# Altium PCB RSM_PCB.PcbDoc
Units mm, origin at the board's own origin, x right, y up, seen from the top; angles counter-clockwise.
Board outline 130 x 62 mm, 4 copper layers (Top Layer, GND, 3V3, Bottom Layer), stack 1.586 mm thick; 74 components, 41 nets, 215 pads, 0 vias.
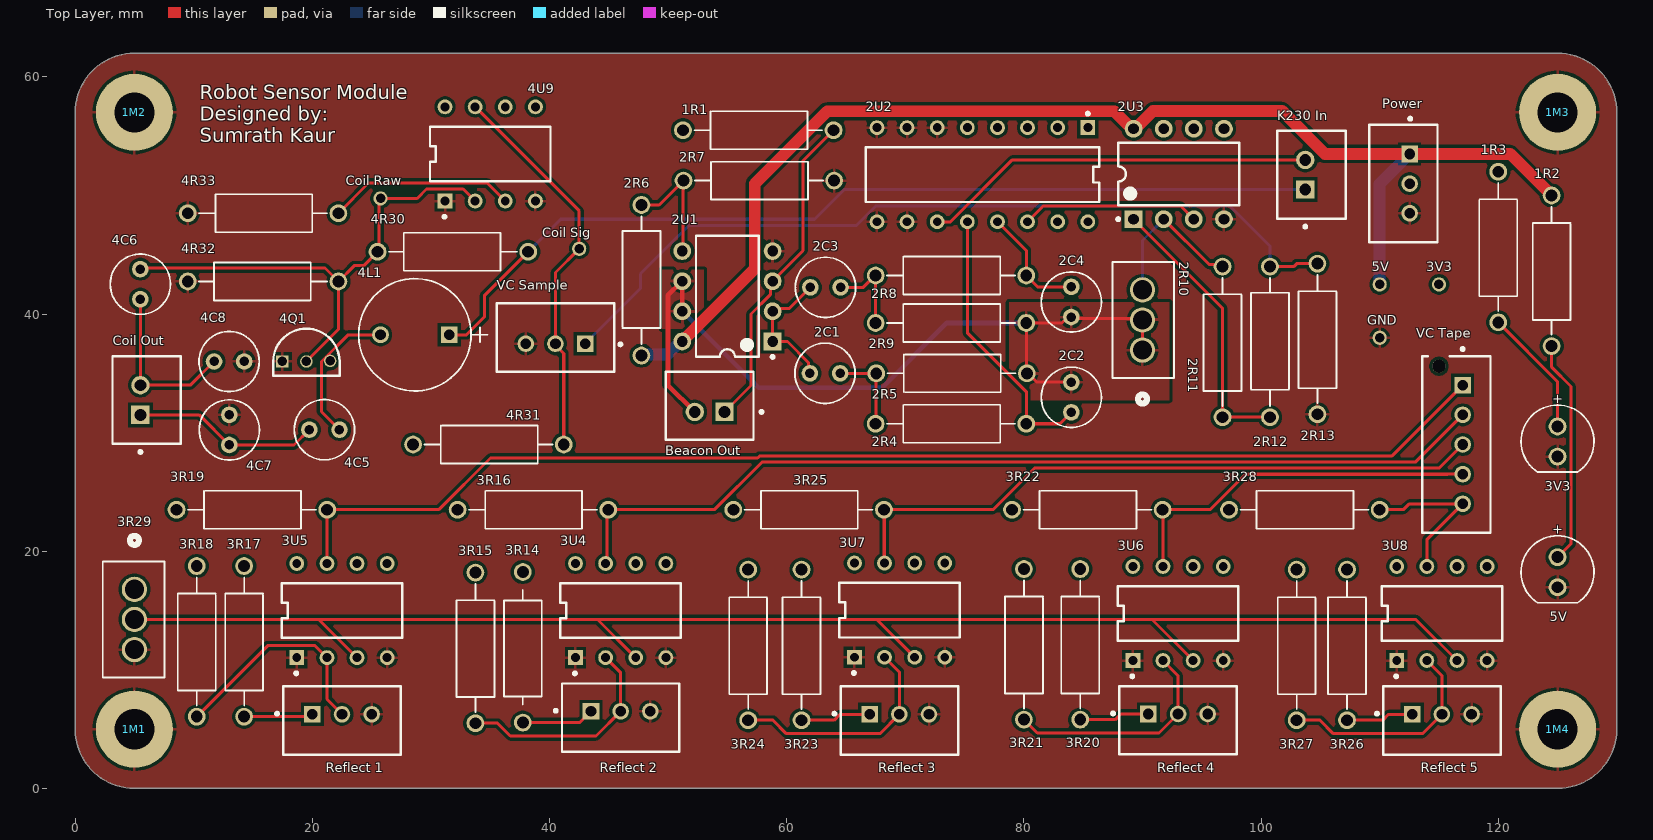
[diagram p0: Top Layer view]
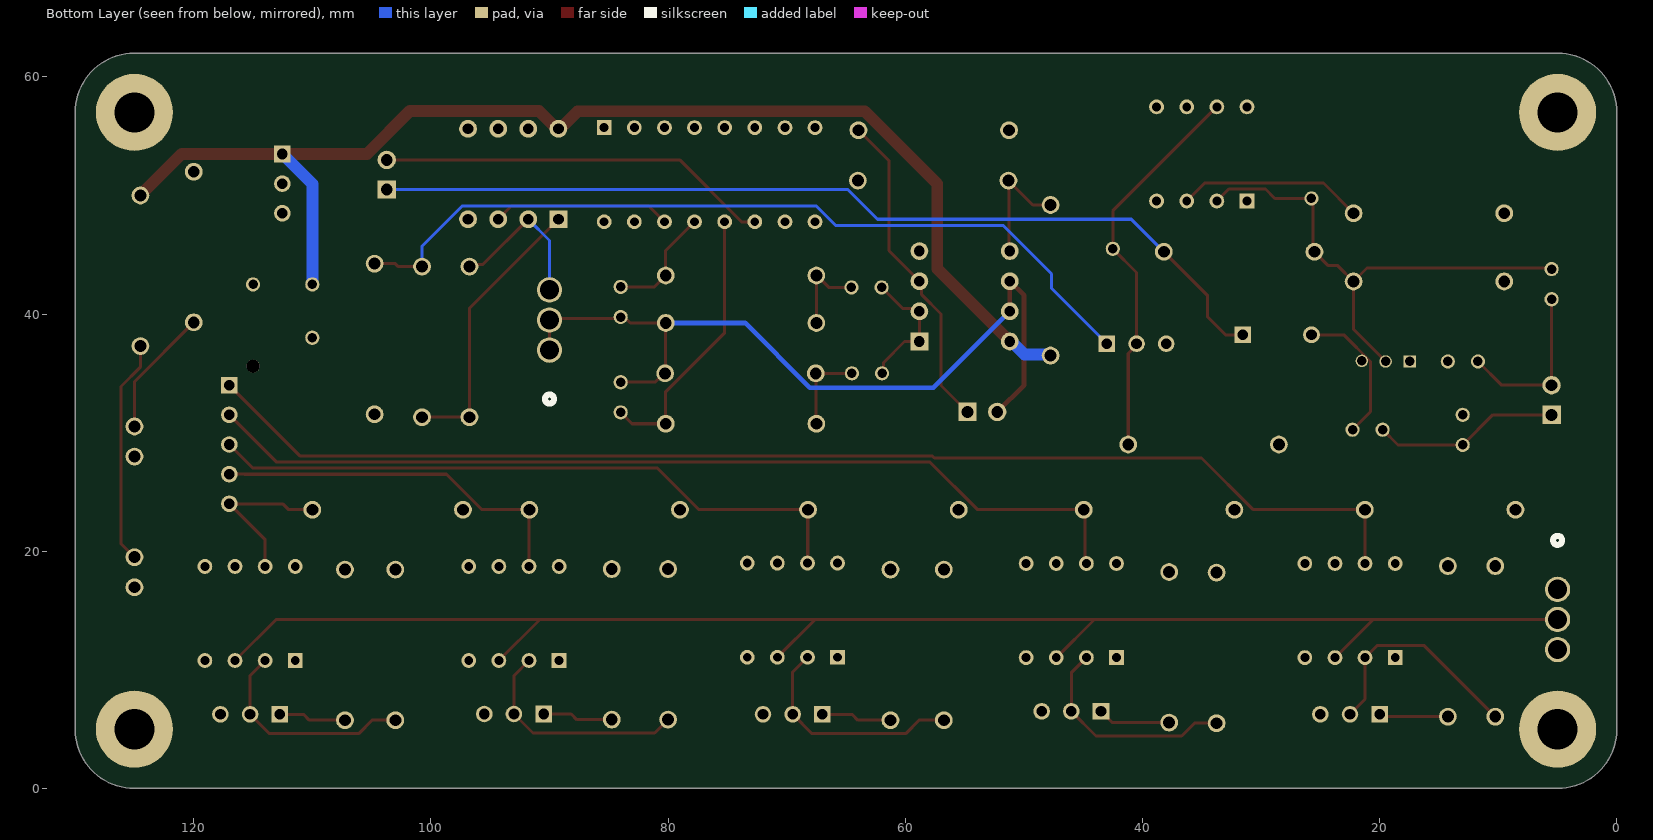
[diagram p1: Bottom Layer view, seen from below]
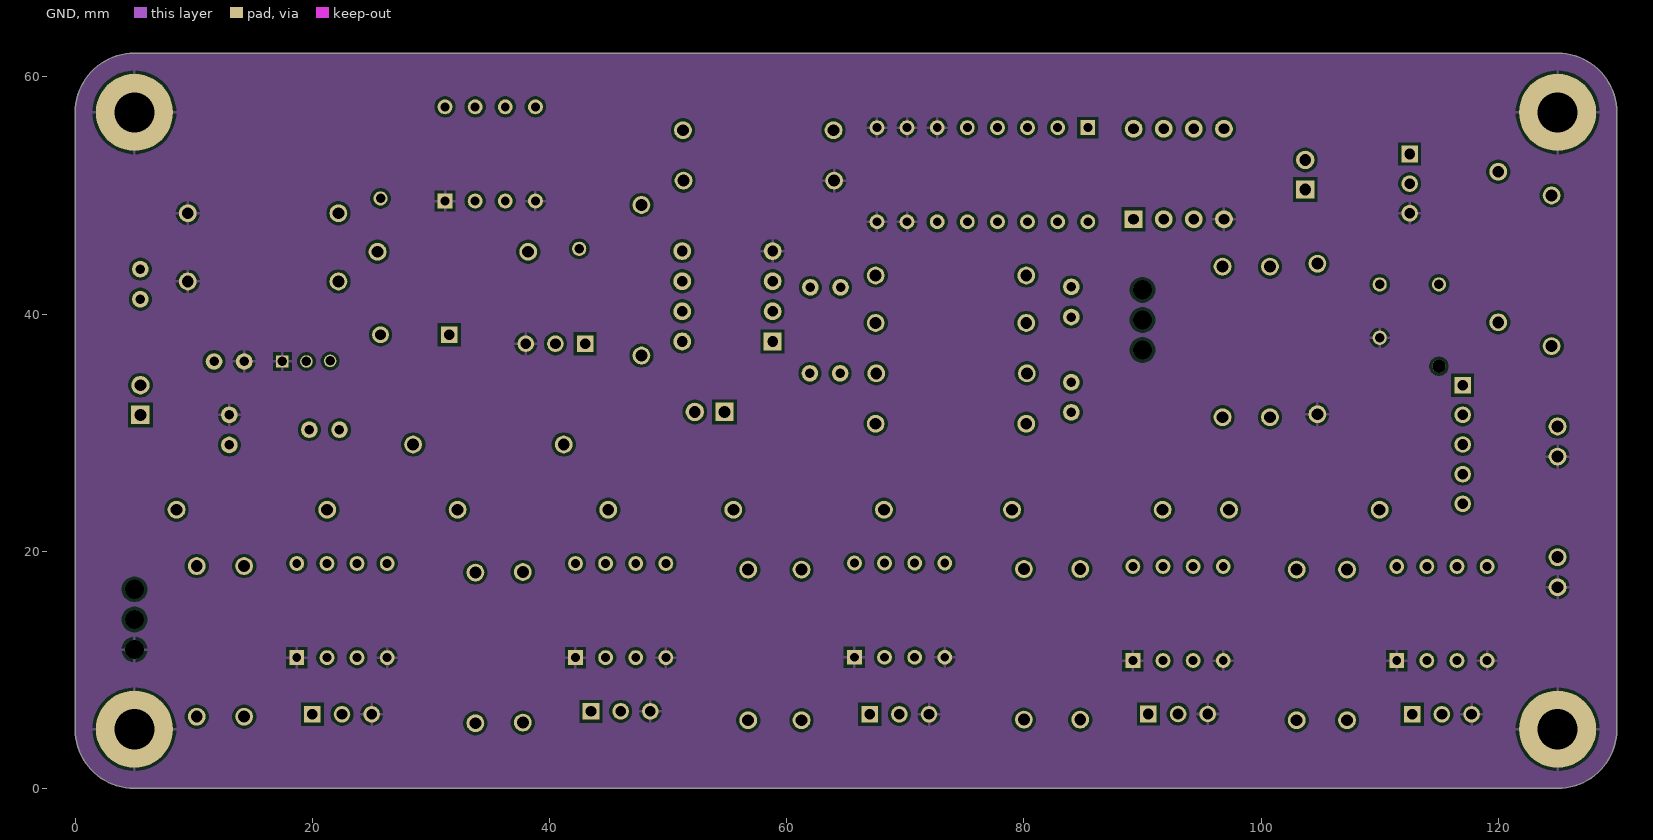
[diagram p2: GND]
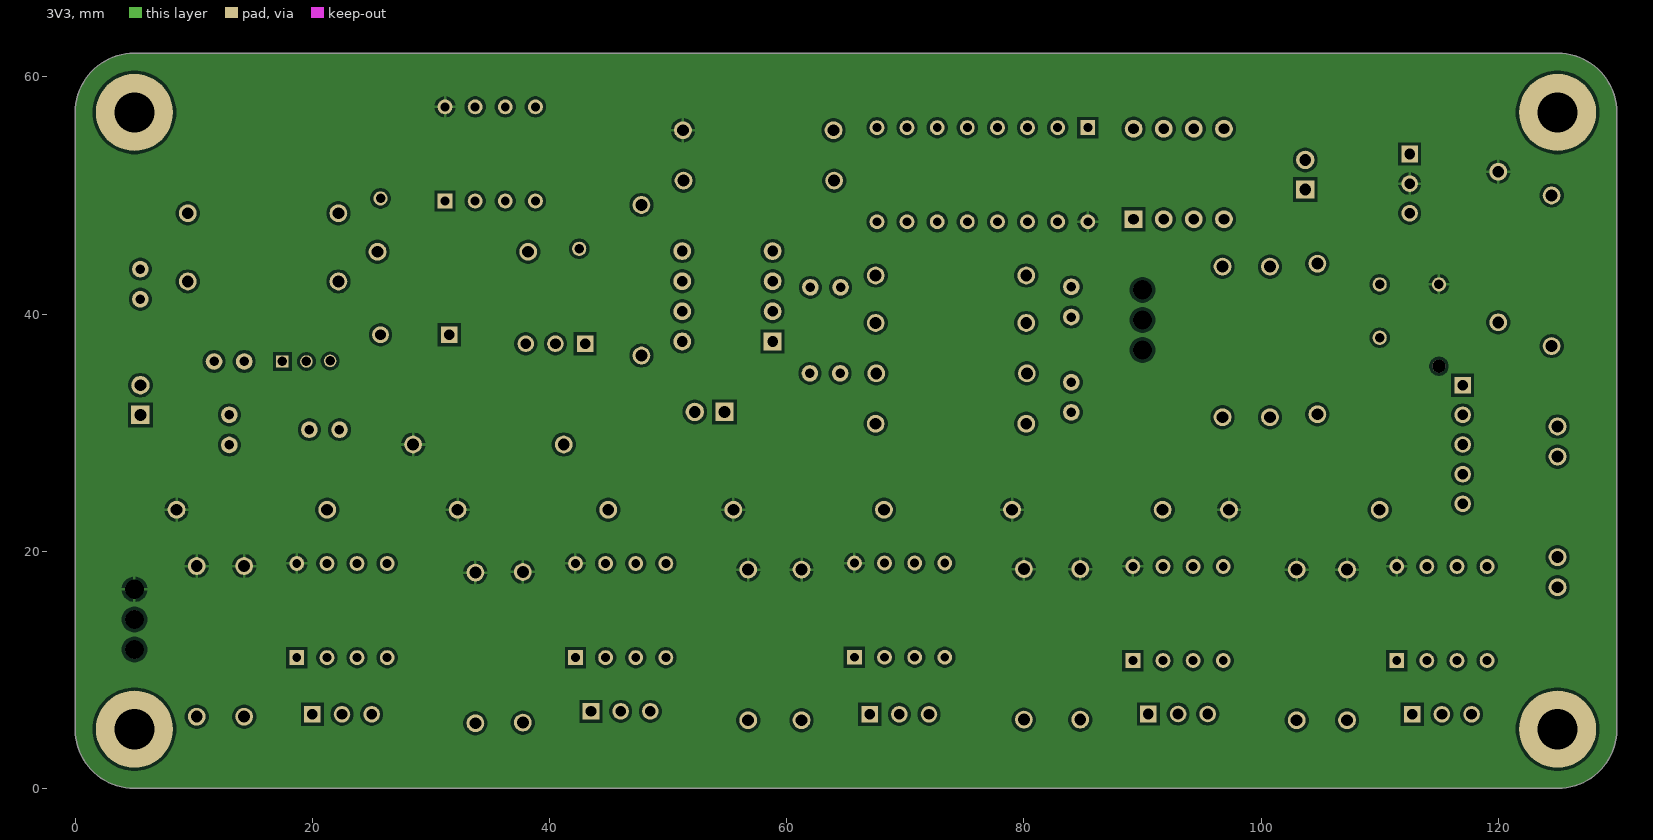
[diagram p3: 3V3]

## Layer stack, top to bottom
Top Solder: solder mask 0.0305, Solder Resist, Dk 3.8
Top Layer: signal copper 0.035
Dielectric 2: prepreg 0.2104, PP-006, Dk 4.4
GND: signal copper 0.0152
Dielectric 1: dielectric 1.065, FR-4, Dk 4.6
3V3: signal copper 0.0152
Dielectric 3: prepreg 0.2104, PP-006, Dk 4.4
Bottom Layer: signal copper 0.035
Bottom Solder: solder mask 0.0305, Solder Resist, Dk 3.8

## Board outline
0,5 0,57 cw(c5,57) 5,62 125,62 cw(c125,57) 130,57 130,5 cw(c125,5) 125,0 5,0 cw(c5,5)

## Design rules (kind name [scope] priority, off if disabled: settings)
Clearance [All] p1: gap=0.254 ignorepadtopadclearanceinfootprint=FALSE
PolygonConnect [All] p1: connectstyle=Relief reliefconductorwidth=0.254 reliefentries=4 polygonreliefangle="90 Angle" airgapwidth=0.254
RoutingVias [All] p1: holewidth=0.711 width=1.27 viastyle="Through Hole" minholewidth=0.711 minwidth=1.27 maxholewidth=0.711 maxwidth=1.27
SolderMaskExpansion [All] p1: expansion=0 istentingtop=FALSE
SupplyNets "Schematic Supply Nets_4" [InNet('QSD124_BOTTOM')] p1: voltage=0.000
SupplyNets "Schematic Supply Nets_3" [InNet('3V3')] p2: voltage=0.000
SupplyNets "Schematic Supply Nets_2" [InNet('5V')] p3: voltage=0.000
SupplyNets "Schematic Supply Nets_1" [InNet('GND')] p4: voltage=0.000
Width Width_Power [InNetClass('Power Nets')] p1: maxlimit=1 minlimit=0.4 preferedwidth=0.5
Width [All] p2: maxlimit=0.254 minlimit=0.254 preferedwidth=0.254
30 further rules are at their usual default settings.

## Classes and differential pairs
net class "Power Nets": 3V3 5V GND QSD124_BOTTOM
component class RSM: 1M1 1M2 1M3 1M4 1R1 1R2 1R3 3V3 5V J4 "K230 In" M1 M2 M3 M4 R1 "VC Sample"
component class Designator: 3R14 3R15 3R16 3R17 3R18 3R19 3R20 3R21 3R22 3R23 3R24 3R25 3R26 3R27 3R28 3R29 3U4 3U5 3U6 3U7 3U8
component class "Beacon Detector": 2C1 2C2 2C3 2C4 2R4 2R5 2R6 2R7 2R8 2R9 2R10 2R11 2R12 2R13 2U1 2U2 2U3 C1 C2 C3 C4 R4 R5 R6 R7 R8 R9 R10 R11 R12 R13 U1 U2 U3

## Components (designator, comment, footprint, x,y, rotation, side; value= is the part's Value field where it differs from the comment)
1M1 "M3 Mounting Hole Plated" "M3 Screw Hole - Plated" 5,5 r0 top (schematic designator M1)
1M2 "M3 Mounting Hole Plated" "M3 Screw Hole - Plated" 5,57 r0 top (schematic designator M2)
1M3 "M3 Mounting Hole Plated" "M3 Screw Hole - Plated" 125,57 r0 top (schematic designator M3)
1M4 "M3 Mounting Hole Plated" "M3 Screw Hole - Plated" 125,5 r0 top (schematic designator M4)
1R1 "? ohms" "Axial 0.5" 51.25,55.5 r0 top (schematic designator R1)
1R2 "150R" "Axial 0.5" 124.5,50 r270 top (schematic designator R2)
1R3 "100R" "Axial 0.5" 120,52 r270 top (schematic designator R3)
2C1 "100 nF" "Generic small capacitor" 61.96,35 r0 top (schematic designator C1)
2C2 "100 nF" "Generic small capacitor" 84,31.71 r90 top (schematic designator C2)
2C3 "10 nF" "Generic small capacitor" 62,42.25 r0 top (schematic designator C3)
2C4 "10 nF" "Generic small capacitor" 84,42.29 r270 top (schematic designator C4)
2R4 "1k" "Axial 0.5" 67.5,30.75 r0 top (schematic designator R4)
2R5 "3.3k" "Axial 0.5" 67.55,35 r0 top (schematic designator R5)
2R6 "100k" "Axial 0.5" 47.75,36.5 r90 top (schematic designator R6)
2R7 "100k" "Axial 0.5" 51.3,51.25 r0 top (schematic designator R7)
2R8 "1k" "Axial 0.5" 67.5,43.25 r0 top (schematic designator R8)
2R9 "3.3k" "Axial 0.5" 67.5,39.25 r0 top (schematic designator R9)
2R10 "10k pot" RES3_PV36W103C01B00_BRN 90,36.96 r90 top (schematic designator R10)
2R11 "1k" "Axial 0.5" 96.75,44 r270 top (schematic designator R11)
2R12 "100k" "Axial 0.5" 100.75,31.3 r90 top (schematic designator R12)
2R13 "100k" "Axial 0.5" 104.75,44.25 r270 top (schematic designator R13)
2U1 "TL082IP" P0008A 55,41.5 r180 top (schematic designator U1)
2U2 "CD4053BE" FP-N0016A-MFG 76.5,51.75 r270 top (schematic designator U2)
2U3 "TL082IP" P0008A 93.06,51.81 r90 top (schematic designator U3)
3R14 "100R" "Axial 0.5" 37.75,18.25 r270 top (schematic designator R14)
3R15 "4.7k" "Axial 0.5" 33.75,18.2 r270 top (schematic designator R15)
3R16 "10k" "Axial 0.5" 32.25,23.5 r0 top (schematic designator R16)
3R17 "100R" "Axial 0.5" 14.25,18.75 r270 top (schematic designator R17)
3R18 "4.7k" "Axial 0.5" 10.25,18.75 r270 top (schematic designator R18)
3R19 "10k" "Axial 0.5" 8.55,23.5 r0 top (schematic designator R19)
3R20 "100R" "Axial 0.5" 84.75,18.5 r270 top (schematic designator R20)
3R21 "4.7k" "Axial 0.5" 80,18.5 r270 top (schematic designator R21)
3R22 "10k" "Axial 0.5" 79,23.5 r0 top (schematic designator R22)
3R23 "100R" "Axial 0.5" 61.25,18.45 r270 top (schematic designator R23)
3R24 "4.7k" "Axial 0.5" 56.75,18.45 r270 top (schematic designator R24)
3R25 "10k" "Axial 0.5" 55.5,23.5 r0 top (schematic designator R25)
3R26 "100R" "Axial 0.5" 107.25,18.45 r270 top (schematic designator R26)
3R27 "4.7k" "Axial 0.5" 103,18.45 r270 top (schematic designator R27)
3R28 "10k" "Axial 0.5" 97.3,23.5 r0 top (schematic designator R28)
3R29 "100k pot" RES3_PV36W103C01B00_BRN 5,16.79 r270 top (schematic designator R29)
3U4 "LM311P" FP-P0008A-MFG 46,15 r90 top (schematic designator U4)
3U5 "LM311P" FP-P0008A-MFG 22.5,15 r90 top (schematic designator U5)
3U6 "LM311P" FP-P0008A-MFG 93,14.75 r90 top (schematic designator U6)
3U7 "LM311P" FP-P0008A-MFG 69.52,15.03 r90 top (schematic designator U7)
3U8 "LM311P" FP-P0008A-MFG 115.25,14.75 r90 top (schematic designator U8)
3V3 "151051VS04000" WL-TMRC_D5.9H8.7 125,29.25 r270 top (schematic designator D2)
3V3 "3V3" TESTPOINT 115,42.5 r180 top (schematic designator TP2)
4C5 "100 nF" "Generic small capacitor" 19.75,30.25 r0 top (schematic designator C5)
4C6 "100 nF" "Generic small capacitor" 5.5,41.25 r90 top (schematic designator C6)
4C7 "100 nF" "Generic small capacitor" 13,28.96 r90 top (schematic designator C7)
4C8 "10 nF" "Generic small capacitor" 14.25,36 r180 top (schematic designator C8)
4L1 "4.7 mH" IND_BOURNS_RLB1014 31.541,38.25 r180 top (schematic designator L1)
4Q1 "2N3904BU" 2n3904 18.23,36 r0 top (schematic designator Q1)
4R30 "10k" "Axial 0.5" 38.2,45.25 r180 top (schematic designator R30)
4R31 "10k" "Axial 0.5" 28.5,29 r0 top (schematic designator R31)
4R32 "33k" "Axial 0.5" 22.2,42.75 r180 top (schematic designator R32)
4R33 "100R" "Axial 0.5" 9.5,48.5 r0 top (schematic designator R33)
4U9 "LM311P" FP-P0008A-MFG 35,53.5 r90 top (schematic designator U9)
5V "151051VS04000" WL-TMRC_D5.9H8.7 125,18.23 r270 top (schematic designator D1)
5V "5V" TESTPOINT 110,42.5 r180 top (schematic designator TP1)
"Beacon Out" "QSD124" FP-B2B-XH-A_LF_SN-MFG 53.5,32.275 r180 top (schematic designator J4)
"Coil Out" "Coil" FP-B2B-XH-A_LF_SN-MFG 6.025,32.75 r90 top (schematic designator J3)
"Coil Raw" "Coil Raw" TESTPOINT 25.75,49.75 r90 top (schematic designator TP5)
"Coil Sig" "Coil Rectified" TESTPOINT 42.5,45.5 r90 top (schematic designator TP4)
GND "GND" TESTPOINT 110,38 r180 top (schematic designator TP3)
"K230 In" "K230_In" FP-B2B-XH-A_LF_SN-MFG 104.25,51.75 r90 top (schematic designator J5)
Power "Power" FP-B3B-XH-A_LF_SN-MFG 112,51 r270 top (schematic designator J2)
"Reflect 1" "Reflect 1" FP-B3B-XH-A_LF_SN-MFG 22.5,5.725 r0 top (schematic designator J6)
"Reflect 2" "Reflect 2" FP-B3B-XH-A_LF_SN-MFG 46,5.975 r0 top (schematic designator J7)
"Reflect 3" "Reflect 3" FP-B3B-XH-A_LF_SN-MFG 69.5,5.725 r0 top (schematic designator J9)
"Reflect 4" "Reflect 4" FP-B3B-XH-A_LF_SN-MFG 93,5.75 r0 top (schematic designator J10)
"Reflect 5" "Reflect 5" FP-B3B-XH-A_LF_SN-MFG 115.25,5.725 r0 top (schematic designator J11)
"VC Sample" "VC Samples" FP-B3B-XH-A_LF_SN-MFG 40.5,38.025 r180 top (schematic designator J1)
"VC Tape" "VC Tape Signals" FP-B5B-XH-AM_LF_SN-MFG 116.475,29 r90 top (schematic designator J8)

## Footprints (in the part's own frame and the unit in brackets; to place one, negate y for a bottom-side part, rotate by r counter-clockwise, add the part's x,y. Pads: shape width x height; smd on the part's side, far side on the other; paste and mask are expansions set on the pad)
2n3904 [mm] "TO, 3-Leads, Body Dia 4.79mm, Pitch 1.27mm"
  rect 1.05x1.05 hole 0.8 mask+0.05: 1(-0.75,0)
  round 1.05 hole 0.8 mask+0.05: 2(1.27,0) 3(3.275,0.05)
  silkscreen extent -1.53,-1.21 4.07,2.77
"Axial 0.5" [mm]
  round 1.5 hole 1: 1(0,0) 2(12.7,0)
  silkscreen extent 0.95,-1.6 11.75,1.6
FP-B2B-XH-A_LF_SN-MFG [mm]
  rect 1.55x1.55 hole 1 paste-2539.97 mask+0: 1(-1.25,0.525)
  round 1.55 hole 1 paste-2539.97 mask+0: 2(1.25,0.525)
  silkscreen extent -4.5,-2.88 3.7,2.88, body extent -3.8,-2.98 3.8,2.98, height 0.25
FP-B3B-XH-A_LF_SN-MFG [mm]
  rect 1.4x1.4 hole 0.9 paste-2539.97 mask+0: 1(-2.5,0.525)
  round 1.4 hole 0.9 paste-2539.97 mask+0: 2(0,0.525) 3(2.5,0.525)
  silkscreen extent -5.6,-2.88 4.95,2.88, body extent -5.05,-2.98 5.05,2.98, height 0.25
FP-B5B-XH-AM_LF_SN-MFG [mm]
  rect 1.4x1.4 hole 0.9 paste-2539.97 mask+0: 1(5,-0.525)
  round 1.4 hole 0.9 paste-2539.97 mask+0: 2(2.5,-0.525) 3(0,-0.525) 4(-2.5,-0.525) 5(-5,-0.525)
  round 1.1 hole 1.1 unplated paste-2539.97 mask+0: ""(6.6,1.475)
  silkscreen extent -7.45,-2.88 8.17,2.88, body extent -7.55,-2.98 7.55,2.98, height 0.25
FP-N0016A-MFG [mm]
  rect 1.25x1.25 hole 0.75 paste-2539.97 mask+0: 1(-3.97,8.89)
  round 1.25 hole 0.75 paste-2539.97 mask+0: 2(-3.97,6.35) 3(-3.97,3.81) 4(-3.97,1.27) 5(-3.97,-1.27) 6(-3.97,-3.81) 7(-3.97,-6.35) 8(-3.97,-8.89) 9(3.97,-8.89) 10(3.97,-6.35) 11(3.97,-3.81) 12(3.97,-1.27) 13(3.97,1.27) 14(3.97,3.81) 15(3.97,6.35) 16(3.97,8.89)
  silkscreen extent -5.27,-9.84 2.3,9.84, body extent -4.69,-9.94 4.69,9.94, height 0.25
FP-P0008A-MFG [mm]
  rect 1.25x1.25 hole 0.75 paste-2539.97 mask+0: 1(-3.97,3.81)
  round 1.25 hole 0.75 paste-2539.97 mask+0: 2(-3.97,1.27) 3(-3.97,-1.27) 4(-3.97,-3.81) 5(3.97,-3.81) 6(3.97,-1.27) 7(3.97,1.27) 8(3.97,3.81)
  silkscreen extent -5.42,-5.08 2.3,5.08, body extent -4.69,-5.18 4.69,5.18, height 0.25
"Generic small capacitor" [mm]
  round 1.4 / inner round 1.4 / far side round 1.2 hole 0.8: 1(0,0) 2(2.54,0)
  silkscreen extent -1.27,-2.54 3.81,2.54
IND_BOURNS_RLB1014 [mil]
  rect 56x56 hole 36 paste-99999 mask+0: 1(0,0)
  round 56 hole 36 paste-99999 mask+0: 2(228,0)
  silkscreen extent -128,-186 300,186, body extent -68,-181 295,181, height 512
"M3 Screw Hole - Plated" [mm]
  round 6.5 hole 3.4: 1(0,0)
P0008A [mm] "DIP, 8-Leads, Body 10.15x6.6mm, Pitch 2.54mm"
  rect 1.5x1.5 hole 0.9: 1(-3.81,3.81)
  round 1.5 hole 0.9: 2(-3.81,1.27) 3(-3.81,-1.27) 4(-3.81,-3.81) 5(3.81,-3.81) 6(3.81,-1.27) 7(3.81,1.27) 8(3.81,3.81)
  silkscreen extent -3.94,-5.1 2.65,5.23, body extent -3.95,-5.07 3.95,5.07, height 5.08
RES3_PV36W103C01B00_BRN [mil]
  round 84 / inner round 60 / far side round 84 hole 64 paste-99999 mask+0: 1(0,0) 2(100,0) 3(200,0)
  silkscreen extent -177,-105 292,100
TESTPOINT [mm] "Testpoint"
  round 1.2 hole 0.8 paste-2539.97: 1(0,0)
WL-TMRC_D5.9H8.7 [mm] "THT Mono-color Round Color LED, 2-leads"
  round 1.5 hole 1: 1(-1.27,0) 2(1.27,0)
  silkscreen extent -3.07,-3.07 2.58,3.08, body extent -2.95,-2.95 2.45,2.95, height 9.2

## Part data
1M1 1M2 1M3 1M4: library part CMP-019-000000-3, Design Item ID="M3 Mounting Hole Plated", Source="UBC Formula Electric.SchLib"
1R1 1R2 1R3 2R4 2R5 2R6 2R7 2R8 2R9 2R11 2R12 2R13 3R14 3R15 3R16 3R17 3R18 3R19 3R20 3R21 3R22 3R23 3R24 3R25 3R26 3R27 3R28 4R30 4R31 4R32 4R33: library part RES_GENERIC
2C1 2C2 2C3 2C4 4C5 4C6 4C7 4C8: library part CAP_GENERIC
2R10 3R29: library part "Trimmer pot"
2U1 2U3: library part CMP-0017-01015-2, "JFET-Input Operational Amplifier, 7 to 36 V, -40 to 85 degC, 8-pin DIP (P8), Pb-Free (RoHS)", Manufacturer="Texas Instruments", Rating=Catalog, Total Supply Voltage(Max)(+5V is 5, +/-5V is 10)=36, Total Supply Voltage(Min)(+5V is 5, +/-5V is 10)=7, CMRR(Min)(dB)=75, Code_JEDEC=MS-001, ComponentLink1Description="Manufacturer URL", ComponentLink1URL=http://www.ti.com/, ComponentLink2Description=Datasheet, ComponentLink2URL=http://www.ti.com/lit/ds/symlink/tl082.pdf, ComponentLink3Description="Package Specification", ComponentLink3URL=http://www.ti.com/litv/pdf/mpdi001b, DatasheetVersion=SLOS081G, Eco-Plan="Pb-Free (RoHS)", GBW(Typ)(MHz)=3, IIB(Max)(pA)=200, Iq per channel(Max)(mA)=2.8, Mounting Technology="Through Hole", Number of Channels=2, Offset Drift(Typ)(uV/C)=18, PackageDescription="8-Pin Plastic In-Line, Body 9.59 x 6.35 mm, Pitch 2.54 mm", PackageReference=P0008A, PackageVersion="4040082/E, 04/2010", PartNumber=TL082IP, Slew Rate(Typ)(V/us)=13, Sub Family="General Purpose Amplifier, High Supply Voltage Amplifier (>=30V)", Vio (25C)(Max)(mV)=6, Vn at 1kHz(Typ)(nV/rtHz)=18
2U2: library part CMP-1575-00068-4, "IC MUX/DEMUX TRIPLE 2X1 16DIP", Case/Package=PDIP, Max Dual Supply Voltage=9V, Max Input Voltage=20V, Max Operating Temperature=125°C, Min Dual Supply Voltage=2.5V, Min Operating Temperature=-55°C, Min Supply Voltage=3V, Nominal Supply Current=80nA, On-State Resistance=240R, Operating Supply Voltage=18V, Package Quantity=25, Bandwidth=30MHz, Contact Plating=Gold, Lead Free="Lead Free", Logic Function=Mux, Max Supply Voltage=20V, Mount="Through Hole", Number of Channels=3, Number Of Circuits=3, Number Of Inputs=6, Number Of Outputs=3, Number of Pins=16, Number of Terminals/Pins=16, Operating Supply Current=80nA, Packaging=Rail/Tube, Polarity=Non-Inverting, Propagation Delay=60ns, Quiescent Current=80nA, Radiation Hardening=No, REACH SVHC="No SVHC", RoHS Compliant=Yes, Supply Type=Single, Throw Configuration=SPDT, Turn-Off Delay Time=450ns, Turn-On Delay Time=720ns, Weight=0.03357oz, Width=7.62mm
3U4 3U5 3U6 3U7 3U8 4U9: library part CMP-1685-00016-2, Ambient Temperature Range High=70°C, Case Code (Imperial)=0603, Case Code (Metric)=1608, Case/Package=PDIP, Dual Supply Voltage=9V, Input Bias Current=250nA, Input Offset Voltage (Vos)=2mV, Manufacturer Lifecycle Status=ACTIVE, Max Dual Supply Voltage=15V, Max Junction Temperature (Tj)=150°C, Max Output Voltage=7.5mV, Max Power Dissipation=500mW, Max Supply Current=7.5mA, Max Supply Voltage=30V, Min Dual Supply Voltage=1.75V, Min Operating Temperature=0°C, Min Supply Voltage=3.5V, Operating Supply Voltage=28V, Output Current=50mA, Power Rating=100mW, Resistance=390Ω, Tolerance=1%, Voltage Gain=106.02dB, Voltage Rating=75V, Contact Plating=Gold, Height=5.08mm, Lead Free="Lead Free", Length=9.81mm, Lifecycle Status=Production, Max Input Current=250nA, Max Operating Temperature=70°C, Mount="Surface Mount, Through Hole", NexarPartId=24336, Nominal Supply Current=7.5mA, Number of Channels=1, Number Of Circuits=1, Number Of Elements=1, Number of Pins=8, Output Current per Channel=50mA, Output Type=TTL, Packaging="Tape and Reel", Propagation Delay=115ns, Quiescent Current=7.5mA, Radiation Hardening=No, REACH SVHC="No SVHC", Response Time=165ns, RoHS=Compliant, Schedule B="8542390000, 8542390000", Thickness=3.9mm, Turn-On Delay Time=115ns, Type="General Purpose", Weight=2.012816mg, Width=6.35mm
3V3 5V: library part CMP-1488-00007-2, Case/Package=Radial, Color=Green, Forward Current=100mA, Forward Voltage=2.1V, Max Operating Temperature=85°C, Max Reverse Voltage (DC)=5V, Min Operating Temperature=-40°C, Test Current=20mA, Dominant Wavelength=572nm, Height=8.6mm, Length=5mm, Lens Size=5mm, Lens Style="Circular, Diffused, Round", Luminous Intensity=140mcd, Mount="Through Hole", NexarPartId=29717814, Packaging=Bulk, Peak Wavelength=573nm, REACH SVHC=Unknown, RoHS=Compliant, Viewing Angle=40°, Wavelength=572nm, Width=5mm
3V3 5V "Coil Raw" "Coil Sig" GND: library part CMP-020-0000-4, Design Item ID="Thru-Hole Test Point", Source="UBC Formula Electric.SchLib"
4L1: library part RLB1014-472KL, "No Description Available", Manufacturer_Name="Bourns Electronics", Copyright="Copyright (C) 2026 Ultra Librarian. All rights reserved.", Manufacturer_Part_Number=RLB1014-472KL
4Q1: library part 2n3904, "NPN General-Purpose Amplifier, 40 V VCEO, 0.2 A, -55 to 150 degC, 2-Pin TO-92, RoHS, Bulk", Manufacturer=FairchildSemiconductor, Maximum Collector Base Voltage=60V, Maximum Collector Emitter Saturation Voltage=0.2@1mA@10mA, Maximum Collector Emitter Voltage=40V, Maximum DC Collector Current=0.2A, Maximum Operating Frequency=300(Min)MHz, Maximum Power Dissipation=625mW, Minimum DC Current Gain=40@0.1mA@1V, Operating Temperature=-55to150degC, Package=3TO-92, Package Description="3-Pin Transistor Outline Package, Body Dia 4.79 mm, Pitch 1.27 mm", Package Reference=TO-92, Category=GPBJT, Datasheet URL=https://datasheet.ciiva.com/4722/2n3904-82270-4722369.pdf, Datasheet Version="Rev. 1.1.0, 10/2014", Manufacturer URL=https://www.fairchildsemi.com/, Mounting=ThroughHole, Packaging=Bulk, Pin Count=3, Rad Hard=No, Type=NPN
"Beacon Out" "Coil Out" "K230 In": library part CMP-2000-05888-3, "CONN HEADER VERT 2POS 2.5MM", Color=Natural, Contact Resistance=20mR, Current Rating=3A, Housing Color=White, Insulation Resistance=1GR, Max Operating Temperature=85°C, Max Voltage Rating (AC)=250V, Min Operating Temperature=-25°C, Connector Type="Male Pin", Contact Material=Brass, Contact Plating=Tin, Contact Type="Male Pin", Depth=5.75mm, Fastening Type=Detent, Housing Material=Polyamide, Lead Free="Lead Free", Lead Pitch=2.5mm, Length=7.4mm, Max Current Rating=3A, Max Voltage Rating (DC)=250V, Mount="Through Hole", Number of Contacts=2, Number of Positions=2, Number of Rows=1, Orientation=Straight, Packaging=Bulk, Pitch=2.5mm, REACH SVHC="No SVHC", Series=XH, Termination=Solder, Voltage Rating=250V, Voltage Rating (AC)=250V, Wire/Cable Gauge=22AWG
Power "Reflect 1" "Reflect 2" "Reflect 3" "Reflect 4" "Reflect 5" "VC Sample": library part CMP-17439-000014-3, "CONN HEADER VERT 3POS 2.5MM", Color=Natural, Contact Resistance=20mR, Current Rating=3A, Flammability Rating="UL94 V-0", Housing Color=White, Insulation Resistance=1GR, Max Operating Temperature=85°C, Max Voltage Rating (AC)=250V, Min Operating Temperature=-25°C, Connector Type=Header, Contact Finish - Mating=TIN, Contact Material=Brass, Contact Plating=Tin, Contact Shape=Square, Contact Type="Male Pin", Depth=5.75mm, Fastening Type=Detent, Gender=Male, Housing Material=Polyamide, Insulation Color=Natural, Insulation Material=Nylon, Lead Free="Lead Free", Lead Pitch=2.5mm, Length=9.9mm, Max Current Rating=3A, Max Voltage Rating (DC)=250V, Mount="Through Hole", Number of Contacts=3, Number of Positions=3, Number of Rows=1, Orientation=Straight, Packaging=Bulk, Pitch=2.5mm, REACH SVHC="No SVHC", Series=XH, Termination=Solder, Voltage Rating=250V, Voltage Rating (AC)=250V, Wire/Cable Gauge=22AWG
"VC Tape": library part CMP-17439-000304-1, "CONN HEADER VERT 5POS 2.5MM", Color=Green, Contact Resistance=20mR, Flammability Rating="UL94 V-0", Housing Color=White, Insulation Color=Natural, Max Current Rating=3A, Max Operating Temperature=85°C, Max Voltage Rating (AC)=250V, Min Operating Temperature=-25°C, Connector Type=Header, Contact Finish - Mating=TIN, Contact Material=Brass, Contact Plating=Copper, Contact Shape=Square, Contact Type="Male Pin", Depth=5.75mm, Fastening Type=Detent, Housing Material=Polyamide, Insulation Material=Nylon, Lead Free="Lead Free", Length=14.9mm, Mated Stacking Heights=9.8mm, Mount="Through Hole", Number of Positions=5, Number of Rows=1, Orientation=Straight, Packaging=Bulk, Pitch=2.5mm, Series=XH, Termination=Solder, Voltage Rating=250V

## Nets (pads, with @x,y where several pads share a name; then routed paths per layer and width w, separated by ;. In a path a pad name is that pad's centre, name@x,y a point inside that pad or via, vN(x,y) a via of type N, cw(c..) or ccw(c..) an arc to the next point about the centre after c; other vN are vias at no path point)
1kHz: 2C2.1 2R4.2 2U2.12 | length 23.3
  Top Layer w0.254: 2U2.12 75.23,38.421 80.2,33.451 2R4.2 83.04,30.75 2C2.1
3V3: 1R1.1 1R3.1 2U2.16 3R14.1 3R15.1 3R16.1 3R17.1 3R18.1 3R19.1 3R20.1 3R21.1 3R22.1 3R23.1 3R24.1 3R25.1 3R26.1 3R27.1 3R28.1 3R29.1 3U4.8 3U5.8 3U6.8 3U7.8 3U8.8 3V3.1@115,42.5 4R31.1 4U9.8 Power.2
5V: 1R2.1 2R6.1 2U1.8 2U3.8 5V.1@110,42.5 Power.1 | length 105.7
  Top Layer w1: 2U1.8 57.306,43.806 57.306,50.983 63.422,57.099 87.636,57.099 89.115,55.62 2U3.8 89.385,55.62 90.889,57.124 101.763,57.124 105.387,53.5 Power.1 116.791,53.5 116.795,53.504 120.996,53.504 1R2.1
  Bottom Layer w1: 2R6.1 47.846,36.596 49.96,36.596 51.055,37.69 2U1.8 ; 5V.1@110,42.5 110,50.975 Power.1
10kHz: 2C4.1 2R8.2 2U2.13 | length 9.7
  Top Layer w0.254: 2U2.13 80.2,45.35 2R8.2 81.16,42.29 2C4.1
BEACON_ADC: 2R12.2 2R13.1 "VC Sample.1" | length 70.5
  Top Layer w0.254: 2R12.2 102.75,44 103,44.25 2R13.1
  Bottom Layer w0.254: 43,37.5 47.67,42.17 47.67,43.389 51.767,47.486 65.894,47.486 67.538,49.131 97.338,49.131 100.75,45.719 2R12.2
BEACON_FREQ: 2U2.11 "K230 In.2" | length 33.2
  Top Layer w0.254: 2U2.11 73.807,47.78 79.027,53 103.725,53
BEACON_RAW: 1R1.2 2U1.3 "Beacon Out.1" | length 27.6
  Top Layer w0.254: 54.75,31.75 56.985,33.985 56.985,40.004 58.62,41.639 58.62,42.58 2U1.3 61.38,45.34 61.38,52.93 1R1.2
COIL_BOTTOM: 4C6.1 4C8.2 "Coil Out.2" | length 14.3
  Top Layer w0.254: 4C6.1 5.5,34 9.71,34 4C8.2
COIL_RAW: 4C6.2 4Q1.2 4R30.2 4R32.1 4U9.2 "Coil Raw.1" | length 42.7
  Top Layer w0.254: 4C6.2 5.591,43.881 21.069,43.881 4R32.1 ; 4Q1.2 19.5,36.011 22.2,38.711 4R32.1 ; 4U9.2 32.724,50.536 29.623,50.536 28.837,49.75 25.75,49.75 25.625,49.625 25.625,45.375 4R30.2 24.334,44.084 23.534,44.084 4R32.1
COIL_TOP: 4C5.1 4C7.1 "Coil Out.1" | length 15.8
  Top Layer w0.254: 5.5,31.5 10.46,31.5 4C7.1 18.46,28.96 4C5.1
GND: 1M1.1 1M2.1 1M3.1 1M4.1 2R7.2 2R13.2 2U1.4 2U2.6 2U2.7 2U2.8 2U2.9 2U2.10 2U3.4 3R29.3 3U4.1 3U4.4 3U5.1 3U5.4 3U6.1 3U6.4 3U7.1 3U7.4 3U8.1 3U8.4 3V3.2 4C7.2 4C8.1 4Q1.1 4R32.2 4R33.1 4U9.1 4U9.4 5V.2 "Reflect 1.3" "Reflect 2.3" "Reflect 3.3" "Reflect 4.3" "Reflect 5.3" "VC Sample.3" GND.1 Power.3
LED_1: 3R17.2 "Reflect 1.1" | length 5.8
  Top Layer w0.254: 3R17.2 19.8,6.05 20,6.25
LED_2: 3R14.2 "Reflect 2.1" | length 6.1
  Top Layer w0.254: 3R14.2 42.55,5.55 43.5,6.5
LED_3: 3R23.2 "Reflect 3.1" | length 6
  Top Layer w0.254: 3R23.2 64,5.75 64.5,6.25 67,6.25
LED_4: 3R20.2 "Reflect 4.1" | length 5.9
  Top Layer w0.254: 3R20.2 87.7,5.8 88.175,6.275 90.5,6.275
LED_5: 3R26.2 "Reflect 5.1" | length 5.7
  Top Layer w0.254: 3R26.2 110.25,5.75 110.75,6.25 112.75,6.25
Net1D1_1: 1R2.2 5V.1@125,19.5 | length 18.9
  Top Layer w0.254: 1R2.2 124.5,35.518 126.131,33.887 126.131,20.631 5V.1@125,19.5
Net1D2_1: 1R3.2 3V3.1@125,30.52 | length 10.9
  Top Layer w0.254: 1R3.2 125,34.3 3V3.1@125,30.52
Net2C1_1: 2C1.1 2C3.1 2U1.1 2U1.2 | length 11.3
  Top Layer w0.254: 2C1.1 61.845,35.115 61.845,35.905 60.06,37.69 2U1.1 2U1.2 59.048,40.468 60.218,40.468 2C3.1
Net2C1_2: 2C1.2 2R4.1 2R5.1 | length 7.3
  Top Layer w0.254: 2C1.2 2R5.1 67.525,34.975 67.525,30.775 2R4.1
Net2C3_2: 2C3.2 2R8.1 2R9.1 | length 7.4
  Top Layer w0.254: 2C3.2 66.462,42.25 67.462,43.25 2R8.1 2R9.1
Net2R6_2: 2R6.2 2R7.1 2U1.5 | length 10.4
  Top Layer w0.254: 2R6.2 49.25,49.2 2R7.1 51.245,51.195 51.245,45.365 2U1.5
Net2R10_3: 2R10.3 2R11.1 2U3.2 | length 13.3
  Top Layer w0.254: 2U3.2 95.619,44.171 96.579,44.171 2R11.1
  Bottom Layer w0.254: 2R10.3 90,46.21 2U3.2
Net2R11_2: 2R11.2 2R12.1 2U3.1 | length 23.8
  Top Layer w0.254: 2U3.1 96.75,40.5 2R11.2 2R12.1
Net4C5_2: 4C5.2 4L1.2 4Q1.3 | length 12.3
  Top Layer w0.254: 4C5.2 20.77,31.77 20.77,36 23.02,38.25 4L1.2
Net4R33_2: 4R33.2 4U9.3 | length 15.8
  Top Layer w0.254: 4R33.2 24.744,51.044 34.756,51.044 4U9.3
OSCILLATOR_ON: 4L1.1 4R30.1 "K230 In.1" | length 78.3
  Top Layer w0.254: 4L1.1 33,38.25 34.5,39.75 34.5,41.55 4R30.1
  Bottom Layer w0.254: 4R30.1 40.944,47.994 62.344,47.994 64.849,50.5 103.725,50.5
OSCILLATOR_SIGNAL: 4R31.2 4U9.7 "Coil Sig.1" "VC Sample.2" | length 33.2
  Top Layer w0.254: 4U9.7 42.5,48.7 42.5,45.5 40.5,43.5 40.5,37.5 40.5,37.371 41.2,36.671 4R31.2
QSD124_BOTTOM: 2C2.2 2C4.2 2R5.2 2R9.2 2R10.1 2R10.2 2U1.6 2U1.7 "Beacon Out.2" | length 69.9
  Top Layer w0.254: 2C2.2 81.099,34.25 80.349,35 2R5.2 80.225,35.025 80.225,39.225 2R9.2 83.19,39.25 83.69,39.75 2C4.2 84.125,39.625 89.875,39.625 2R10.2 2R10.1
  Top Layer w0.4: 2U1.7 2U1.6 49.986,41.566 49.986,34.014 52.25,31.75
  Bottom Layer w0.4: 2U1.7 57.624,33.796 68.049,33.796 73.503,39.25 2R9.2
REFLECT_SIG_1: 3R18.2 3U5.2 "Reflect 1.2" | length 19.2
  Top Layer w0.254: 3R18.2 16.236,12.036 20.224,12.036 3U5.2 21.23,7.52 22.5,6.25
REFLECT_SIG_2: 3R15.2 3U4.2 "Reflect 2.2" | length 18.6
  Top Layer w0.254: 3R15.2 35.612,5.5 36.693,4.419 43.919,4.419 46,6.5 46,9.76 3U4.2
REFLECT_SIG_3: 3R24.2 3U7.2 "Reflect 3.2" | length 19.2
  Top Layer w0.254: 3R24.2 58.837,5.75 59.968,4.619 67.869,4.619 69.5,6.25 69.5,9.81 3U7.2
REFLECT_SIG_4: 3R21.2 3U6.2 "Reflect 4.2" | length 19.2
  Top Layer w0.254: 3R21.2 81.131,4.669 91.394,4.669 93,6.275 93,9.51 3U6.2
REFLECT_SIG_5: 3R27.2 3U8.2 "Reflect 5.2" | length 18.5
  Top Layer w0.254: 3R27.2 104.962,5.75 106.093,4.619 113.619,4.619 115.25,6.25 115.25,9.51 3U8.2
TAPE_SIGNAL_1: 3R19.2 3U5.7 "VC Tape.1" | length 104.6
  Top Layer w0.254: 3U5.7 21.24,18.98 21.24,23.49 3R19.2 30.651,23.5 35.02,27.869 57.551,27.869 57.7,28.018 111.018,28.018 117,34
TAPE_SIGNAL_2: 3R16.2 3U4.7 "VC Tape.2" | length 80
  Top Layer w0.254: 3U4.7 44.84,19.08 44.84,23.39 3R16.2 53.901,23.5 57.91,27.51 113.01,27.51 117,31.5
TAPE_SIGNAL_3: 3R25.2 3U7.7 "VC Tape.3" | length 55.6
  Top Layer w0.254: 3U7.7 68.225,19.025 68.225,23.475 3R25.2 77.401,23.5 80.901,27 115,27 117,29
TAPE_SIGNAL_4: 3R22.2 3U6.7 "VC Tape.4" | length 31.3
  Top Layer w0.254: 3U6.7 91.715,18.735 91.715,23.485 3R22.2 95.701,23.5 98.693,26.492 115.71,26.492 115.718,26.5 117,26.5
TAPE_SIGNAL_5: 3R28.2 3U8.7 "VC Tape.5" | length 13.7
  Top Layer w0.254: 3R28.2 112,23.5 112.5,24 117,24 113.98,20.98 3U8.7
THRESHOLD: 3R29.2 3U4.3 3U5.3 3U6.3 3U7.3 3U8.3 | length 131.5
  Top Layer w0.254: 3R29.2 113.05,14.25 3U8.3 ; 20.55,14.25 3U5.3 ; 44.05,14.25 3U4.3 ; 67.6,14.25 3U7.3 ; 90.8,14.25 3U6.3
TO_AMPLIFY: 2U2.14 2U3.3 | length 15
  Top Layer w0.254: 2U2.14 81.661,49.131 93.199,49.131 2U3.3
pads on no net: 2U2.1 2U2.2 2U2.3 2U2.4 2U2.5 2U2.15 2U3.5 2U3.6 2U3.7 3U4.5 3U4.6 3U5.5 3U5.6 3U6.5 3U6.6 3U7.5 3U7.6 3U8.5 3U8.6 4U9.5 4U9.6 "VC Tape."

## Polygon pours and split planes (outlines as drawn)
GND on Top Layer "GND_L01_P004" (solid, remove dead copper, pour order 4): 0,5 0,57 cw(c5,57) 5,62 125,62 cw(c125,57) 130,57 130,5 cw(c125,5) 125,0 5,0 cw(c5,5)
QSD124_BOTTOM on Top Layer "QSD124_BOTTOM_L01_P003" (solid, remove dead copper, pour order 3): 49.5,43.75 53,43.75 53,38.75 49.5,38.75
QSD124_BOTTOM on Top Layer "QSD124_BOTTOM_L01_P002" (solid, remove dead copper, pour order 2): 78.75,41 92.25,41 92.25,32.75 78.75,32.75
GND on GND "GND_L02_P000" (solid, remove dead copper, pour order 0): 0,5 0,57 cw(c5,57) 5,62 125,62 cw(c125,57) 130,57 130,5 cw(c125,5) 125,0 5,0 cw(c5,5)
3V3 on 3V3 "3V3_L03_P001" (solid, remove dead copper, pour order 1): 0,5 0,57 cw(c5,57) 5,62 125,62 cw(c125,57) 130,57 130,5 cw(c125,5) 125,0 5,0 cw(c5,5)

## Silkscreen, mask and mechanical layers (free items; w line width, h text height)
Top Overlay:
  text "Robot Sensor Module / Designed by:  / Sumrath Kaur" at 10.5,54.5 h1.2
Board Shape:
  the board outline again, w0.254

## Text inside footprints (layer, text, board x,y; h text height)
3V3: Top Overlay "+" at 124.67,33.3 h0.8 r270
5V: Top Overlay "+" at 124.67,22.28 h0.8 r270